# Altium PCB STM32H743I-EVAL2PCBDESIGN.PcbDoc (part 13 of 23)
Units mil, origin at the board's own origin, x right, y up, seen from the top; angles counter-clockwise.
Board outline 6558 x 5417 mil, 8 copper layers (L1_TOP, L2_GND, L3_HS1, L4_POWER, L5_SIG, L6_HS2, L7_GND, L8_BOTTOM), stack 61.368 mil thick; 620 components, 588 nets, 2945 pads, 1724 vias.
Unrouted connection lines stored in the file: 1.
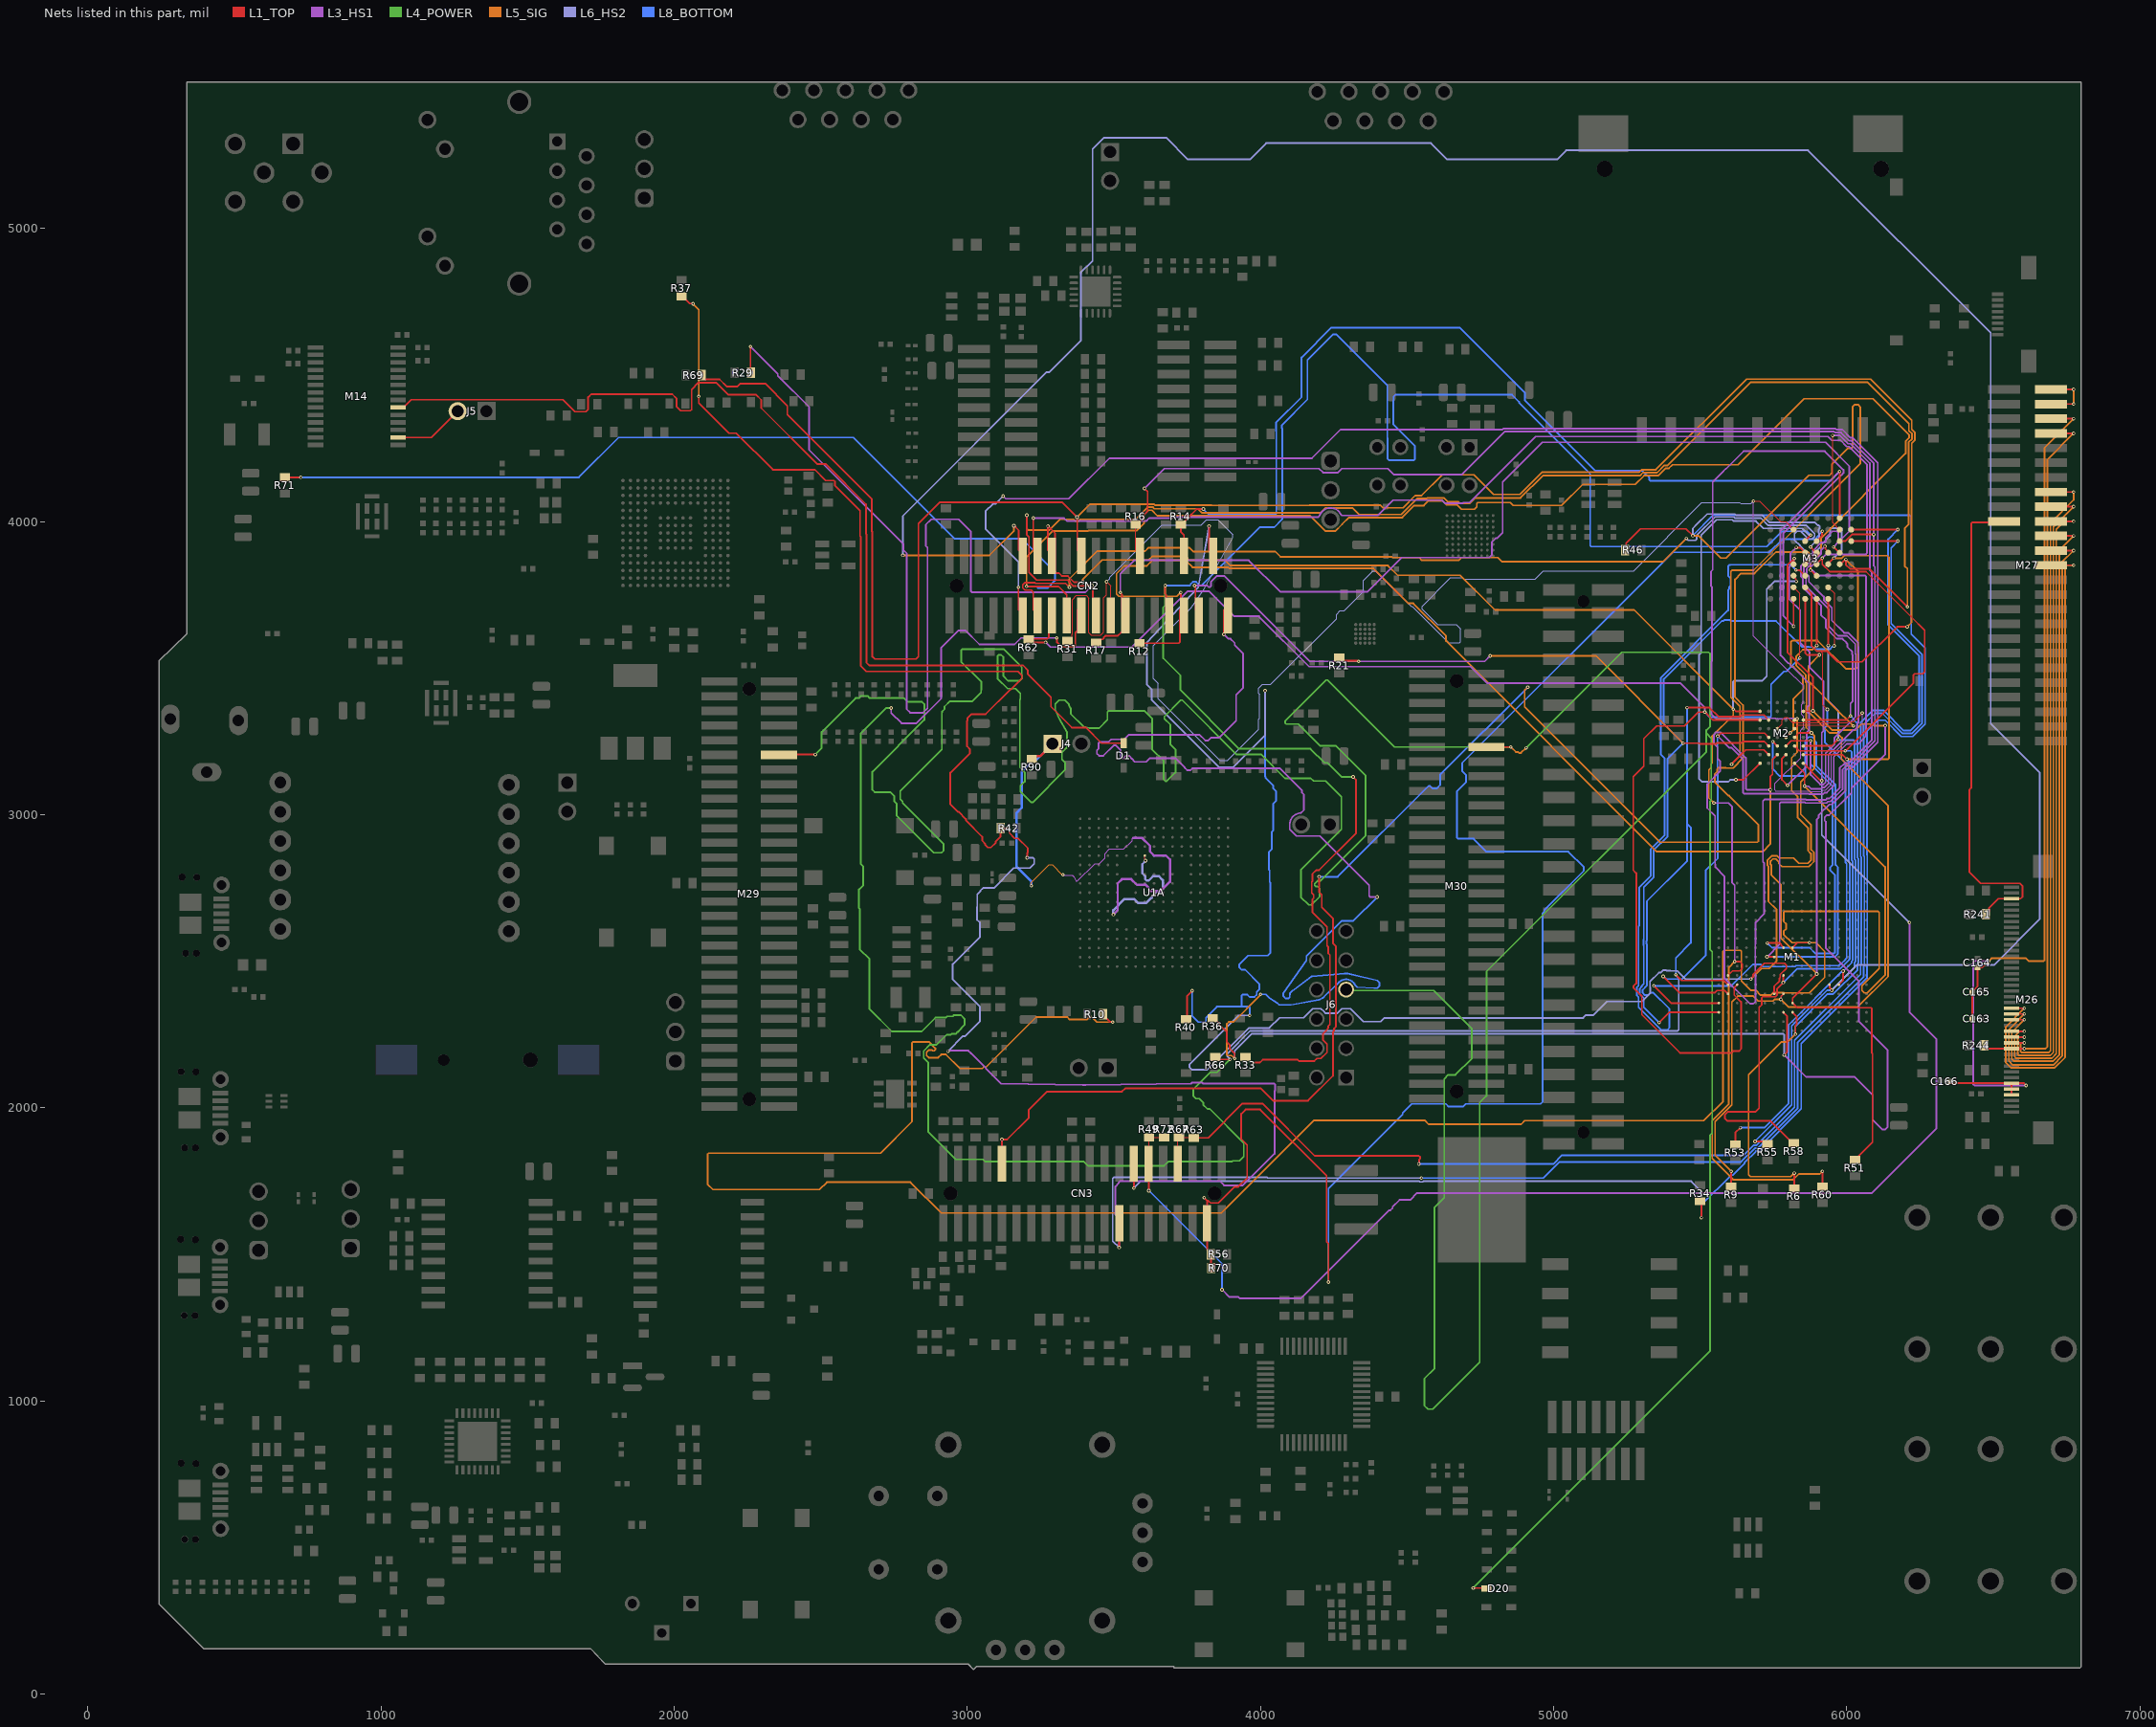
[diagram p10: the nets of this part, all layers, seen from the top]

## Via types
v1: diameter 12, hole 6, L1_TOP to L8_BOTTOM, tented both sides, 1724 vias

## Nets (pads, with @x,y where several pads share a name; then routed paths per layer and width w, separated by ;. In a path a pad name is that pad's centre, name@x,y a point inside that pad or via, vN(x,y) a via of type N, cw(c..) or ccw(c..) an arc to the next point about the centre after c; other vN are vias at no path point) (continued)
A11: M1.H9 M2.H5 M3.D6 R10.1 | length 9820.5
  L1_TOP w6: R10.1@3463.56,2319 3463.56,2315.06 3485.47,2293.15 3494.85,2293.15 v1(3496,2292) ; M1.H9@5815.49,2546.02 5815.49,2546.49 5832,2563 v1(5873,2563) ; M2.H5@5822.83,3175.06 5856,3141.89 v1(5856,3098) ; v1(5926,3916) 5927.15,3914.85 5927.15,3907.27 5935.37,3899.05 M3.D6@5935.37,3893.89
  L3_HS1 w6: v1(5856,3098) 5857.15,3096.85 5869.76,3096.85 5878.62,3088 5911.83,3088 5916.83,3093 5924.53,3093 5938,3106.47 5938,3204.84 6022.67,3289.51 6027.89,3289.51 6035.51,3297.12 6035.51,3309.03 6040,3313.53 6040,3515.86 6040.74,3516.6 6040.74,3552.22 6040,3552.96 6040,3571.53 6039,3572.53 6039,3586.68 6005.27,3620.41 5991.12,3620.41 5949,3662.53 5949,3705.14 5922,3732.14 5922,3743.86 5871,3794.86 5871,3813.81 5863.63,3821.18 5863.63,3839.9 5872.73,3849 5881.53,3849 5895,3862.47 5895,3869.86 5901.07,3875.93 5901.07,3877.98 5913,3889.9 5913,3903 v1(5926,3916)
  L5_SIG w6: v1(3496,2292) 3441.9,2292 3421.9,2312 3419.41,2312 3408.3,2300.89 3349.48,2300.89 3341.48,2308.89 3233.89,2308.89 3064,2139 3055.95,2139 3050.95,2134 2974.62,2134 2927,2181.62 2911,2181.62 2900.38,2171 2868.62,2171 2861,2178.62 2861,2189.38 2868.62,2197 2879.38,2197 2882.01,2194.37 2886.99,2194.37 2890.63,2198.01 2890.63,2202.99 2868.62,2225 2814.51,2225 2811,2221.49 2811,1952.47 2703.53,1845 2117.31,1845 2113.8,1841.49 2113.8,1739.2 2132,1721 2495.57,1721 2520.57,1746 2806,1746 2910.99,1641.01 3866.87,1641.01 4182.86,1957 4560.53,1957 4573.95,1943.57 4888.95,1943.57 4901.38,1956 5512.38,1956 5578,2021.62 5578,2533.49 5581.51,2537 5637.49,2537 5641,2533.49 5641,2432 5672,2401 5689.67,2401 5706.67,2384 5740.38,2384 5749.38,2393 5784.53,2393 5785.53,2392 5872.14,2392 5925,2444.86 5925,2533 5895,2563 v1(5873,2563) 5813.62,2563 5785,2591.62 5785,2602.38 5793.47,2610.86 5793.47,2627.43 5785,2635.9 5785,2666.49 5788.51,2670 6107.49,2670 6111,2666.49 6111,2474.94 6052,2415.94 6052,2399.62 6059.62,2392 6070.38,2392 6131,2452.62 6131,2821.47 5861,3091.47 ; v1(5856,3098) 5856,3096.49 5861,3091.49
A12: CN2.33 M2.G3 M3.B7 R12.1 | length 7634.6
  L1_TOP w4: v1(5952,4294) 5953.11,4292.89 5953.11,3995.63 M3.B7@5976.11,3972.63
  L1_TOP w6: R12.1@3587,3584.56 3587.44,3585 3721.49,3585 3725,3588.51 3725,3698.5 ; v1(3728,3758) 3728,3743 3728,3691 CN2.33@3739,3680.01 ; v1(5739,3085) 5739,3129.86 5747,3137.86 5747,3188.53 M2.G3@5763.42,3204.94
  L3_HS1 w6: v1(5739,3085) 5659.51,3085 5656,3088.51 5656,3193.86 5568.86,3281 5554.62,3281 5547,3273.38 5547,3242.43 5559,3230.43 5559,3192.03 5567.76,3183.27 5567.76,3147.65 5524,3103.89 5524,3022.67 5551,2995.67 5551,2830.62 5552,2829.62 5552,2820.62 5582.5,2790.12 5582.5,2443.12 5670.62,2355 5681.38,2355 5689,2362.62 5689,2452.29 5688,2453.29 5688,2559.53 5689,2560.53 5689,2632.38 5718,2661.38 5718,2835.38 5714,2839.38 5714,3047 5719,3052 5860.88,3052 5862.88,3050 5927.57,3050 5932.57,3055 5940.27,3055 5976,3090.73 5976,3145.62 5976,3158.43 5993.57,3176 6006.38,3176 6086,3255.62 6086,3826.63 6079,3833.63 6079,4199.53 6012.62,4265.91 6004.67,4265.91 5976.57,4294 v1(5952,4294)
  L5_SIG w6: v1(3728,3758) 3715,3745 3516.62,3745 3509,3752.62 3509,3822.53 3535.17,3848.69 3612.26,3848.69 3631.56,3868 3743.72,3868 3767.79,3843.93 3889.86,3843.93 3893.79,3840 4385.72,3840 4504.72,3721 4521.53,3721 4633,3609.53 4633,3592.72 5351.72,2874 5713.77,2874 5739,2899.23 v1(5739,3085)
A13: CN2.34 M2.G4 M3.A7 R14.1 | length 4675.4
  L1_TOP w6: CN2.34@3739,3883 3739,3954.27 3728,3965.27 R14.1@3728,3990.44 3731.94,3990.44 3751,4009.5 3751,4011.53 3782.47,4043 v1(3805,4043) ; M2.G4@5792.94,3204.94 5779,3191 5779,3119 v1(5798,3100) ; M3.A7@5975.98,4012.13 v1@5975.98,4170.87
  L3_HS1 w6: v1(5798,3100) 5798.14,3100 5864,3165.86 5864,3281.38 5872,3289.38 5872,3343.98 5866,3349.98 5866,3368.38 5871,3373.38 5871,3448.84 5803.11,3516.73 5801.14,3516.73 5774,3543.87 5774,3969.15 v1(5975.85,4171)
  L8_BOTTOM w6: v1(3805,4043) 3825,4023 4049.06,4023 4054,4027.94 4054,4309.33 4053,4310.33 4053,4337.67 4140.31,4424.98 4140.31,4559.98 4242.33,4662 4680,4662 4902,4440 4902,4414 5142.81,4173.19 5303.19,4173.19 5327,4149.38 5327,4142.51 5330.51,4139 5943.85,4139 v1(5975.85,4171)
A14: CN2.28 M1.J7 M2.F3 M3.C7 R16.1 | length 6377.8
  L1_TOP w4: R16.1@3574,3990.44 3574,3902.5 3575,3901.5
  L1_TOP w6: R16.1@3574,3990.44 3577.94,3990.44 3601.86,4014.36 3601.86,4022.24 3615,4035.38 3615,4102 v1(3604,4113) ; v1(5728.26,2514.77) M1.J7@5752.24,2514.77 ; v1(5748,3249) 5762.53,3234.47 M2.F3@5763.42,3234.47 ; M3.C7@5976.11,3934.63 5977.48,3933.26 5995.68,3933.26 6018.42,3956 v1(6092,3956)
  L3_HS1 w6: v1(3604,4113) 3672,4181 4199.92,4181 4213.42,4167.5 4264.58,4167.5 4278.08,4181 4434.44,4181 4454.44,4161 4686.95,4161 4832.95,4307 5957.38,4307 5960.38,4304 5980.72,4304 6008.81,4275.91 6016.76,4275.91 6092,4200.67 v1(6092,3956) 6092,3849.43 6096,3845.43 6096,3251.47 6010.53,3166 5997.72,3166 5986,3154.28 5986,3141.47 5986,3086.59 5944.41,3045 5936.72,3045 5931.72,3040 5858.73,3040 5856.73,3042 5774.99,3042 5771.47,3038.49 5771.47,2557.98 v1(5728.26,2514.77)
  L8_BOTTOM w6: v1(5728.26,2514.77) 5959.4,2514.77 5970,2525.37 5970,2820.38 5961.62,2828.77 5961.62,3101.91 5896,3167.53 5896,3247.33 5890,3253.33 5890,3257.38 5882.38,3265 5871.62,3265 5859.13,3252.51 5859.13,3135.14 5855.62,3131.63 5771.51,3131.63 5748,3155.14 v1(5748,3249)
A15: CN2.25 M1.H8 M2.F4 M3.D7 R17.1 | length 6028.4
  L1_TOP w6: R17.1@3440,3587.56 3450.46,3598.01 3461.77,3598.01 3465.28,3601.53 3465.28,3604.24 3470.96,3609.92 3512.8,3609.92 3524.38,3621.49 3528,3621.49 3541,3634.49 CN2.25@3541,3694.97 ; v1(3522,3758) 3522,3756.38 3528,3750.37 3528,3691 CN2.25@3539,3680.01 ; v1(5729,2562) 5771.72,2562 5775.97,2557.76 5775.97,2554.82 5783.99,2546.79 M1.H8@5783.99,2546.02 ; M2.F4@5792.94,3234.47 5810.47,3252 v1(5877,3252) ; v1(5955.37,3913.26) M3.D7@5974.74,3893.89
  L3_HS1 w6: v1(3522,3758) 3522,3821.38 3568.62,3868 3960.09,3868 4068.09,3760 4364.76,3760 4481.76,3877 4780.63,3877 4790,3886.37 4790,3909.47 4789,3910.47 4789,3929.53 4802.47,3943 4806.76,3943 4826,3962.24 4826,4135 4961.5,4270.5 5927.5,4270.5 6008.85,4189.15 6008.85,3966.74 5971,3928.89 ; v1(5877,3252) 5877,3135.62 5909.62,3103 5920.38,3103 5928,3110.62 5928,3208.98 5958,3238.98 5958,3262.38 6030,3334.38 6030,3520 6030.74,3520.74 6030.74,3548.08 6029,3549.82 6029,3582.53 6001.12,3610.41 5970.59,3610.41 5939,3642 5939,3701 5861,3779 5861,3809.67 5853.63,3817.04 5853.63,3844.05 5868.58,3859 5877.38,3859 5885,3866.62 5885,3900.64 5913.36,3929 5925.49,3929 5929,3932.51 5929,3945.27 5950.73,3967 5966.49,3967 5971,3962.49 5971,3928.89 ; v1(5955.37,3913.26) 5971,3928.89
  L8_BOTTOM w6: v1(5729,2562) 5745,2546 5873.38,2546 5893.38,2526 5956.49,2526 5960,2529.51 5960,2793.62 5944,2809.62 5944,2820.38 5951.62,2828 5951.62,3097.77 5877,3172.38 v1(5877,3252)
A16: CN2.21 M2.E4 M3.E7 R29.2 | length 8970.4
  L1_TOP w2: M2.E4@5792.94,3264 5792.94,3264.47 5807,3278.53 v1(5807,3279)
  L1_TOP w6: v1(2260,4597) 2260,4509.56 R29.2@2261.56,4508 ; v1(3203,4021.47) 3203,3954.41 3210,3947.42 3210,3826.59 3236.3,3800.29 3342.09,3800.29 3362.38,3780 3405.24,3780 3406.75,3781.5 v1(3425,3781.5) 3425,3779.88 3428,3776.88 3428,3691 CN2.21@3439,3680.01 ; M3.E7@5976.11,3855.89 5980.27,3855.89 5995.38,3871 v1(5997,3871) 5997,3853.2 6011.05,3839.15 6076.85,3839.15 v1(6207,3709)
  L3_HS1 w6: v1(2260,4597) 2353,4504 2353,4497.86 2460,4390.86 2460,4244.57 2782,3922.57 2782,3902.38 2793,3891.38 2793,3359.72 2804.72,3348 2848.53,3348 2864,3363.47 2864,3911.28 2858,3917.28 2858,3989.02 2876.98,4008 2969.88,4008 3012,3965.88 3012,3762.51 3015.51,3759 3402.5,3759 v1(3425,3781.5)
  L5_SIG w6: v1(3203,4021.47) 3203,3975.01 3206.51,3971.5 3280.38,3971.5 3316.89,4008 3362.62,4008 3368.62,4002 3379.38,4002 3385.38,4008 3573.47,4008 3614.47,4049 3633.53,4049 3638.53,4044 3785.62,4044 3799.62,4030 4206.14,4030 4222.64,4046.5 4314.12,4046.5 4336.62,4024 4479.86,4024 4534.45,4078.59 4567.18,4078.59 4569.6,4081 4625.53,4081 4639.53,4067 4675.62,4067 4679.62,4063 4714.62,4063 4732.62,4081 4887.14,4081 4963.14,4157 5294.47,4157 5304.47,4167 5353.14,4167 5378.14,4192 5389.21,4192 5673.21,4476 6070.17,4476 6212,4334.17 6212,4310.53 6223,4299.53 6223,4282.47 6211,4270.47 6211,3990 6198,3977 6198,3848.31 6207,3839.31 v1(6207,3709) ; v1(5807,3279) 5818,3290 5818,3395.62 5853,3430.62 5853,3441.38 5850,3444.38 5850,3473 5819,3504 5813.51,3504 5810,3507.51 5810,3590.49 5813.51,3594 5901,3594 5997.51,3497.49 6030.49,3497.49 6038.74,3505.74 6038.74,3829.26 v1(5997,3871)
A17: CN2.23 M2.D3 M3.B3 R31.2 | length 7119.6
  L1_TOP w4: R31.2@3342,3593.56 3345.94,3593.56 3357.72,3605.34 3357.72,3614.73 3359,3616.01 3359,3734 3372.52,3747.52 3405.48,3747.52 3414,3739 3414,3621.01 3422.52,3612.49 3455.48,3612.49 3465.24,3622.25 3465.24,3740.11 3475,3749.87 v1(3475,3795) 3489,3781 CN2.23@3489,3680.01 ; v1(5682,4070) 5702.88,4070 5773.88,3999 5792.26,3999 M3.B3@5818.63,3972.63 ; M2.D3@5763.42,3293.53 5779,3309.11 5779,3321.84 5789.22,3332.06 5796.67,3332.06 5814.67,3314.06 6002.78,3314.06 6006.73,3318 6024,3318 v1(6053,3347)
  L3_HS1 w4: v1(5682,4070) 5682,3609 5822,3469 5823.97,3469 5852,3440.97 5852,3381.25 5847,3376.25 5847,3342.11 5853,3336.11 5853,3297.25 5843,3287.25 5843,3194 5755,3106 5755,3083.34 5757.34,3081 5872.89,3081 5874.89,3079 5915.56,3079 5920.56,3084 5928.25,3084 5947,3102.75 5947,3201.11 5999.89,3254 6033,3254 6053,3274 v1(6053,3347)
  L6_HS2 w4: v1(3475,3795) 3486,3806 3486,3811.11 3663.89,3989 3798.39,3989 3815.89,4006.5 3855.23,4006.5 3905.43,3956.3 3905.43,3943.88 3807,3769.26 3764.17,3706.17 3761.83,3703.83 3634.93,3576.93 3634.93,3465.07 3651.51,3448.49 3651.51,3395.51 3862.03,3185 3887,3185 3994,3292 3994,3325.1 3997,3328.1 3997,3410.89 3994,3413.89 3994,3432.11 4006.89,3445 4035.03,3445 4259,3668.97 4259,3683.11 4271.89,3696 4285.89,3696 4351,3761.11 4351,3799 4384,3832 4392.1,3832 4514.1,3710 4516.97,3710 4640.92,3586.05 4678.85,3586.05 4682.95,3590.15 4682.95,3634.05 4668.51,3648.49 4604.54,3648.49 4552,3701.03 4552,3710.97 4649.03,3808 4688.97,3808 4693.97,3803 4752.97,3803 4753.97,3804 4937.73,3804 4965.73,3832 5272.99,3832 5505.99,4065 5634.82,4065 5638.48,4061.35 5673.35,4061.35 v1(5682,4070)
A18: CN2.31 M2.H1 M3.C4 R33.2 | length 7929.3
  L1_TOP w6: v1(3675,3781.5) 3675,3753.52 3678,3750.52 CN2.31@3678,3698.5 ; R33.2@3949,2173.56 3952.94,2173.56 3972.5,2154 3997.53,2154 4007.53,2164 4126.18,2164 4130.95,2159.24 4183.59,2159.24 4192.36,2168 4206.5,2168 4227,2188.5 4227,2217.5 4213,2231.5 4213,2252 4227,2266 4227,2266.86 4231,2270.86 4231,2278.36 4237,2284.36 4237,2521.64 4231,2527.64 4231,2549.14 4227,2553.14 4227,2617.5 4177,2667.5 4177,2710.91 4181.35,2715.26 4181.35,2726.03 4175,2732.38 4175,2771.12 4177,2773.12 4177,2797.53 4190.47,2811 4200.14,2811 4326,2936.86 4326,3117.79 4316,3127.79 v1(4316,3129) ; v1(5622,3119) 5647.94,3119 M2.H1@5704,3175.06 ; M3.C4@5858,3934.63 v1(5877.37,3954)
  L4_POWER w6: v1(3675,3781.5) 3675,3714.03 3668,3707.03 3668,3533.86 3727,3474.86 3727,3425.33 3927.33,3225 4170.57,3225 4218.57,3177 4228.71,3177 4276.71,3129 v1(4316,3129)
  L6_HS2 w6: v1(5622,3119) 5602.5,3119 5595.5,3112 5507.03,3112 5496,3123.03 5496,3544.53 5503.51,3552.04 5503.51,3953.51 5556,4006 5610.38,4006 5614.38,4002 5690.24,4002 5715.24,3977 5847.53,3977 5870.53,3954 v1(5877.37,3954)
  L8_BOTTOM w6: v1(3675,3781.5) 3758.49,3781.5 3762,3785.02 3762,3786.89 3769.62,3794.5 3780.38,3794.5 3788,3786.89 3788,3785.02 3791.51,3781.5 3797.5,3781.5 3996.72,3980.72 4046.72,3980.72 4074,4008 4074,4317.62 4073,4318.62 4073,4329.38 4160.31,4416.69 4160.31,4551.69 4247.62,4639 4258.38,4639 4433,4464.38 4433,4284.08 4434.08,4283 4434.08,4213.51 4437.59,4210 4523.49,4210 4527,4213.51 4527,4258 4453,4332 4453,4410.38 4454,4411.38 4454,4426.49 4460.51,4433 4857.67,4433 4882,4408.67 4882,4405.72 5125,4162.72 5125,3918.51 5128.51,3915 5727.57,3915 5779.57,3967 5864.37,3967 v1(5877.37,3954)
A19: CN3.13 M2.G2 M3.D5 R34.1 R46.2 | length 9288.1
  L1_TOP w6: v1(3568,1725.99) CN3.13@3568,1808.99 ; R46.2@5244.44,3903 5247.2,3905.76 5247.2,3926.2 5296,3975 5452,3975 v1(5475,3952) ; R34.1@5500,1680.88 5504,1676.88 v1(5504,1625) ; v1(5607,3172) 5656,3221 5717.83,3221 M2.G2@5733.89,3204.94 ; v1(5876.63,3913.26) M3.D5@5896,3893.89
  L5_SIG w6: v1(5475,3952) 5494.47,3952 5570.99,3875.49 5587.96,3875.49 5870.47,4158 5941.87,4158 5949.48,4165.62 5949.48,4195.87 6003.62,4250 6016.49,4250 6020,4253.51 6020,4391.38 6027.62,4399 6038.38,4399 6046,4391.38 6046,4197.72 5682.28,3834 5608.51,3834 5605,3830.49 5605,3400.53 5636,3369.53 5636,3201 v1(5607,3172)
  L6_HS2 w6: v1(3568,1725.99) 3591.01,1749 4541.62,1749 4543.62,1747 4554.38,1747 4556.38,1749 5470,1749 5504,1715 v1(5504,1625) ; v1(5475,3952) 5475,3977 5488,3990 5524,4026 5618.67,4026 5622.67,4022 5711.14,4022 5717.14,4016 5717.73,4016 5736.73,3997 5892.14,3997 5902.14,3987 5904.49,3987 5908,3983.49 5908,3976.38 5904,3972.38 5904,3961.62 5906,3959.62 5906,3944.25 5876.63,3914.88 v1(5876.63,3913.26)
  L8_BOTTOM w6: v1(5475,3952) 5545,4022 6213.97,4022 6220,4015.97 6220,3616.63 6267.42,3569.21 6267.42,3308.57 6225.71,3266.86 6186.53,3266.86 6131.19,3322.2 6106.62,3322.2 6069,3284.58 6069,2862.81 6070,2861.81 6070,2481.86 6069,2480.86 6069,2442.14 5845,2218.14 5845,1996.33 5700.67,1852 5690.85,1852 5651.12,1812.27 5651.12,1809.62 5611.38,1769.88 5605.88,1769.88 5504,1668 v1(5504,1625)
A20: CN3.11 M2.H6 M3.D4 R49.2 R72.1 | length 5701.6
  L1_TOP w4: CN3.11@3618,1808.99 3620,1810.99 R49.2@3620,1899 3620.56,1898.44 R72.1@3671,1898.44
  L1_TOP w6: CN3.11@3618,1808.99 3619,1807.99 v1(3619,1717) ; v1(5828,3912) 5829.15,3910.85 5841.04,3910.85 5856.63,3895.26 M3.D4@5856.63,3893.89 ; M2.H6@5852.36,3175.06 5910.27,3117.15 5913.85,3117.15 v1(5915,3116)
  L3_HS1 w6: v1(3869,1379) 3894,1354 3924.62,1354 3928.62,1350 4138.86,1350 4438.86,1650 4443.38,1650 4451,1657.62 4451,1662.14 4474.43,1685.57 4510.57,1685.57 4534,1709 6086,1709 6306.17,1929.17 6306.17,2233.69 6214,2325.86 v1(6214,2632) ; v1(5828,3912) 5808,3892 5808,3863.4 5812.95,3858.45 5812.95,3853.48 5804,3844.53 5804,3734.46 5841,3697.46 5841,3587.38 5873,3555.38 5873,3502.81 5921,3454.81 5921,3286.22 5915,3280.22 v1(5915,3116)
  L6_HS2 w6: v1(5915,3116) 5915,2931 v1(6214,2632)
  L8_BOTTOM w6: v1(3619,1717) 3869,1467 v1(3869,1379)
A21: CN3.04 M3.C5 R56.2 R70.1 | length 5796.6
  L1_TOP w6: v1(3808,1693) 3818.61,1682.39 ; R70.1@3831.44,1453 3831.44,1499 R56.2@3830.44,1500 3830.44,1503.94 3818,1516.38 CN3.04@3818,1606 3818,1681.79 3818.61,1682.39 ; v1(4232,1405) 4232,1536.31 4225.43,1542.89 4225.43,1767.57 3999,1994 3949,1994 3934.38,1979.38 3934.38,1893.19 3954.38,1873.19 3954.38,1760.71 3923.9,1730.23 3911.59,1730.23 3856.43,1675.07 3829.57,1675.07 3822.25,1682.39 3818.61,1682.39 ; M3.C5@5897.37,3934.63 5898.74,3934.63 5916.11,3952 5916.11,3966.11 v1(5917,3967)
  L8_BOTTOM w6: v1(4232,1405) 4232,1723.86 4485,1976.86 4485,1982.49 4515.51,2013 4632.72,2013 4642.14,2003.57 4691.21,2003.57 4700.64,2013 4955.1,2013 4962.62,2020.52 4962.62,2663.76 4968,2669.14 4968,2673.82 5103,2808.82 5103,2821.41 5050.41,2874 4771.28,2874 4727.28,2918 4673.51,2918 4670,2921.51 4670,3079 4701.13,3110.13 4701.13,3136.38 4688,3149.52 4688,3176.14 5406.86,3895 5735.86,3895 5780.86,3940 5892,3940 5905.27,3953.27 5905.27,3955.27 v1(5917,3967)
A22: CN3.07 M3.B8 R63.2 R67.1 | length 4965
  L1_TOP w4: CN3.07@3718,1808.99 3718,1894.44 R67.1@3722,1898.44 3771,1898.44 R63.2@3772,1897.44
  L1_TOP w6: R63.2@3772,1897.44 3822.3,1897.44 3938.86,2014 4007.28,2014 4185.28,1836 4540.76,1836 4544.27,1832.49 4544.27,1825.9 4541.15,1822.77 4541.15,1809.15 v1(4540,1808) ; M3.B8@6015.61,3972.76 v1@6174.35,3972.76
  L8_BOTTOM w6: v1(4540,1808) 4999.25,1808 5029.25,1838 5648.57,1838 5682.57,1872 5692.38,1872 5822,2001.62 5822,2229.62 6047,2454.62 6047,2487.15 6050,2490.15 6050,2853.52 6047,2856.52 6047,3314 6089,3356 6125.67,3356 6194.81,3286.86 6217.43,3286.86 6247.42,3316.85 6247.42,3541.27 6141.48,3647.21 6141.48,3939.89 v1(6174.48,3972.89)
A23: CN3.16 M3.C8 R37.1 R42.2 | length 11658.6
  L1_TOP w6: R37.1@2025,4768.44 2028.94,4768.44 2053.23,4744.15 2062.85,4744.15 v1(2064,4743) ; v1(2084,4427) 2084,4404.05 2186.52,4301.52 2211.48,4301.52 2336.1,4176.9 2479.62,4176.9 2516.17,4140.34 2544.62,4140.34 2548.72,4136.24 2548.72,4122.1 2634,4036.81 2634,3950.14 2636,3948.14 2636,3508.14 2655.14,3489 3171.92,3489 3185.54,3475.38 3185.54,3464.62 3147.92,3427 3146.45,3427 3062.45,3343 3014.35,3343 3000,3328.65 3000,3320.86 2999,3319.86 2999,3233.35 3009,3223.35 3009,3210.2 2942,3143.2 2942,3035.62 2967.45,3010.16 2969.8,3010.16 2995.25,2984.71 2995.25,2980.38 3051,2924.64 3051,2910.65 3060.31,2901.34 3060.31,2897.31 3069.62,2888 3080.38,2888 3096.91,2904.53 3096.91,2909.16 3113.44,2925.69 R42.2@3113.44,2954 3136,2954 3143.94,2946.06 3143.94,2937.22 3161.86,2919.3 3172.7,2919.3 3206,2886 3206,2871.31 3204,2869.31 v1(3204,2853) ; v1(3518,1523) CN3.16@3518,1606 ; M3.C8@6015.61,3933.39 v1@6174.35,3933.39
  L3_HS1 w6: v1(2934,2193) 2935.15,2194.15 2939.39,2194.15 2940.24,2195 3003.14,2195 3012.14,2186 3012.14,2185.47 3112.86,2084.76 3114.62,2083 3393.62,2078 3404.38,2078 3764.02,2083 3765.77,2084.76 3767.02,2086 3800.98,2086 3803.98,2083 4046.49,2083 4048.24,2081.24 4050,2079.49 4050,2058.47 4048,2056.47 4048,1843.02 3939.98,1735 3875.49,1735 3860.57,1749.92 3522.44,1749.92 3516,1743.49 3516,1742.38 3505,1731.38 3505,1634.5 3518,1621.5 v1(3518,1523)
  L5_SIG w6: v1(2064,4743) 2084,4723 v1(2084,4427)
  L6_HS2 w6: v1(2934,2193) 2985.57,2244.57 2992.57,2244.57 3043,2295 3043,2344.9 2950,2437.9 2950,2490.1 3043,2583.1 3043,2631.05 3033,2641.05 3033,2684.95 3034,2685.95 3034,2728.38 3044,2738.38 3044,2740.38 3053.62,2750 3090.5,2750 3158.5,2818 3213.38,2818 3228,2832.62 3228,2849.38 3224.38,2853 v1(3204,2853) ; v1(3518,1523) 3496,1545 3496,1758.49 3499.51,1762 4022.45,1762 4024.45,1760 v1(4549,1760)
  L8_BOTTOM w6: v1(4549,1760) 4965.39,1760 5020.39,1815 5639.71,1815 5686.71,1862 5696.53,1862 5833,1998.47 5833,2223 6058,2448 6058,2484.01 6060,2486.01 6060,2857.66 6058,2859.66 6058,3307 6097,3346 6121.53,3346 6190.67,3276.86 6221.57,3276.86 6257.42,3312.71 6257.42,3545.41 6151.48,3651.35 6151.48,3910.52 v1(6174.48,3933.52)
B2: M26.19 M27.25 | length 2262.8
  L1_TOP w6: M26.19@6562.16,2339.52 v1(6606,2339.52) ; M27.25@6697,3851 v1(6774,3851)
  L5_SIG w6: v1(6606,2339.52) 6543,2276.52 6543,2154 6561,2136 6709,2136 6745,2172 6745,3847.49 6748.51,3851 v1(6774,3851)
B3: M26.18 M27.27 | length 2244.3
  L1_TOP w6: M26.18@6562.16,2319.83 v1(6606,2319.83) ; M27.27@6697,3901 v1(6774,3901)
  L5_SIG w6: v1(6606,2319.83) 6553,2266.83 6553,2159.44 6566.44,2146 6704.86,2146 6735,2176.14 6735,3862 v1(6774,3901)
B4: M26.17 M27.29 | length 2237.2
  L1_TOP w6: M26.17@6562.16,2300.15 v1(6606,2300.15) ; M27.29@6697,3951 v1(6774,3951)
  L5_SIG w6: v1(6606,2300.15) 6563,2257.15 6563,2166.98 6571.26,2158.72 6692.05,2158.72 6703.44,2158.72 6725,2180.28 6725,3902 v1(6774,3951)
B5: M26.15 M27.31 | length 2240.7
  L1_TOP w6: M26.15@6562.16,2260.78 v1(6606,2260.78) ; M27.31@6697,4001 v1(6774,4001)
  L5_SIG w6: v1(6606,2260.78) 6590.68,2260.78 6573,2243.1 6573,2174 6578.28,2168.72 6699.3,2168.72 6715,2184.43 6715,3974 6742,4001 v1(6774,4001)
B6: M26.14 M27.33 | length 2218.3
  L1_TOP w6: M26.14@6562.16,2241.09 v1(6606,2241.09) ; M27.33@6697,4051 v1(6774,4051)
  L5_SIG w6: v1(6606,2241.09) 6588.09,2241.09 6583,2236 6583,2182.24 6586.51,2178.72 6695.16,2178.72 6705,2188.57 6705,3982 v1(6774,4051)
B7: M26.13 M27.35 | length 2206.2
  L1_TOP w6: M26.13@6562.16,2221.41 v1(6606,2221.41) ; M27.35@6697,4101 v1(6774,4101)
  L5_SIG w6: v1(6606,2221.41) 6596.51,2221.41 6593,2217.89 6593,2192.24 6596.51,2188.72 6689.49,2188.72 6695,2194.24 6695,3995 6774,4074 v1(6774,4101)
BL_CTRL: M26.12 M27.43 R244.1 | length 2428.7
  L1_TOP w6: R244.1@6470.56,2213 6470.56,2212.5 6481.34,2201.72 v1(6606,2201.72) ; M27.43@6697,4301 v1(6774,4301)
  L5_SIG w6: v1(6606,2201.72) 6678.49,2201.72 6685,2208.24 6685,4212 v1(6774,4301)
BLGND: M27.47 M27.49 | length 204
  L1_TOP w6: M27.47@6697,4401 v1(6774,4401) ; M27.49@6697,4451 v1(6774,4451)
  L5_SIG w6: v1(6774,4401) v1(6774,4451)
BLVDD: C163.1 C164.1 C165.1 C166.1 M26.4 M26.5 M26.6 M27.45 | length 3333.7
  L1_TOP w6: C166.1@6350.67,2090 6350.67,2089.92 6356.88,2083.7 6360.31,2083.7 6360.4,2083.61 M26.6@6542.38,2083.61 ; C163.1@6428.17,2304 6428.17,2394.83 C165.1@6428,2395 6428,2395.08 6446,2413.08 C164.1@6446,2478.17 6462.17,2478.17 v1(6484,2500) ; M26.4@6562.11,2044.2 M26.5@6562.11,2063.88 M26.6@6562.11,2083.57 6604.43,2083.57 v1(6612,2076) ; M27.45@6697,4351 v1(6774,4351)
  L3_HS1 w6: v1(6484,2500) 6435.51,2500 6432,2496.49 6432,2079.51 6435.51,2076 v1(6612,2076)
  L5_SIG w6: v1(6484,2500) 6494,2510 6611.38,2510 6621.38,2500 6671.49,2500 6675,2503.51 6675,4252 v1(6774,4351)
BOOT0: J4.1 R90.2 U1A.E8 | length 2134.3
  L1_TOP w4: U1A.E8@3605.52,2859.99 3605.52,2847.65 3608,2845.16 v1(3608,2843)
  L1_TOP w8: R90.2@3220,3189.56 3229.78,3199.34 3247.91,3199.34 J4.1@3290.57,3242
  L3_HS1 w2: v1(3326,2795) 3327,2794 3357.16,2794 3358.84,2792.32 cw(c3353,2783) 3362.9,2787.79 3369.5,2774.17 3370.67,2773 3375,2773 3435,2833 3449.7,2833 3469,2852.3 3469,2866.87 3485.13,2883 3533.8,2883 3562,2911.2 3562,2918.26 3564.83,2921.09 3565.46,2920.46
  L3_HS1 w8: v1(3498,2659) 3513.02,2674.02 3513.02,2765.77 3527.28,2780.03 3558.83,2780.03 3578.86,2760 3609.3,2760 3618.99,2750.31 3618.99,2743.69 3623.68,2739 3658.8,2739 3691.04,2771.24 3691.04,2847.06 3677.1,2861 3636.2,2861 3623,2874.2 3623,2893.81 3596.35,2920.46 3565.46,2920.46
  L5_SIG w2: v1(3218,2757.21) 3218,2768.56 3278.44,2829 3289.44,2829 3323.44,2795 v1(3326,2795)
  L6_HS2 w8: v1(3498,2659) 3498,2674 3536,2712 3568.5,2712 3581.49,2699.02 3610.79,2699.02 3629,2717.22 3629,2719.79 3647.2,2738 3657.8,2738 3667,2747.2 3667,2776.8 3653.8,2790 3633.5,2790 3618.23,2774.73 3611.6,2774.73 3606.92,2779.42 3606.92,2789.8 3597,2799.72 3597,2830.92 3608,2841.92 v1(3608,2843)
  L8_BOTTOM w8: v1(3218,2757.21) 3218,2772.56 3167,2823.56 3167,3005.37 3185.84,3024.21 3185.84,3147.04 3219.82,3181.02 3229.59,3181.02 J4.1@3290.57,3242
Bootloader_BOOT0: D1.2 M14.20 | length 3539.7
  L1_TOP w6: M14.20@1058,4389.61 1077,4389.61 1103.39,4416 1619.95,4416 1660.67,4375.28 1698.68,4375.28 1706.34,4382.94 1706.34,4424.76 1716.3,4434.72 1993.12,4434.72 2007.5,4420.34 2007.5,4392.66 2021.88,4378.28 2055.24,4378.28 2059.34,4382.38 2059.34,4450.49 2082.85,4474 2143,4474 2184.28,4432.72 2279.12,4432.72 2296.78,4415.06 2296.78,4387.38 2487.27,4196.9 2516.34,4196.9 2654,4059.24 2654,3958.43 2656,3956.43 2656,3518.8 2665.37,3509.43 3189.72,3509.43 3205.54,3493.6 3205.54,3480.04 3285,3400.57 3285,3368.72 3356.29,3297.42 3404.11,3297.42 3457.4,3244.13 D1.2@3534,3244.13
Bootloader_RESET: J5.2 M14.16 | length 229.4
  L1_TOP w6: M14.16@1069,4286.76 1170.76,4286.76 J5.2@1261,4377
CLK: M26.38 M27.32 R241.1 | length 1701
  L1_TOP w6: R241.1@6474.56,2660 6485.34,2670.78 6485.34,2681.34 6517.49,2713.49 M26.38@6562.11,2713.49 6562.2,2713.58 6593.19,2713.58 6600.01,2720.4 6600.01,2756.36 6590.6,2765.76 6456.24,2765.76 6419,2803 6419,3085.47 6425,3091.47 6425,3993.49 6428.51,3997 6533,3997 M27.32@6537,4001
D0: CN2.39 M1.R8 M2.B6 M3.E3 R36.2 | length 9275.7
  L1_TOP w6: R36.2@3837,2305.56 3840.94,2305.56 3860,2286.5 3860,2282.98 3885.28,2257.7 3885.28,2224.48 3895.28,2214.48 3895.28,2201.1 3912,2184.38 v1(3912,2168) ; v1(3875,3615.5) 3875,3698.5 ; M1.R8@5783.99,2325.54 5797.06,2312.48 5797.06,2191.15 5787,2181.1 v1(5787,2180) ; M3.E3@5818.63,3855.89 5819.85,3857.11 v1@5819.85,3872.85 ; v1(5821,3874) v1@5819.85,3872.85 ; M2.B6@5852.36,3352.94 5852.71,3353.29 5884.29,3353.29 v1(5885,3354) 5885,3467 5798,3554 5798,3851 v1@5819.85,3872.85
  L3_HS1 w6: v1(3875,3615.5) 3890.35,3600.15 3897.99,3600.15 3912.2,3585.95 3912.2,3578.31 3941,3549.5 3941,3432.62 3917,3408.62 3917,3320.62 3859.38,3263 3832.38,3263 3822.38,3253 3811.62,3253 3791.62,3273 3551.67,3273 3535.67,3257 3490.67,3257 3481.67,3248 3451.3,3248 3447.78,3244.49 3447.78,3225.42 3442,3219.64 3442,3208.62 3449.62,3201 3464.05,3201 3500.05,3237 3505.02,3237 3523,3219.02 3523,3196.51 3526.51,3193 3532.62,3193 3540.62,3201 3551.38,3201 3558,3194.38 3558,3193.47 3560.47,3191 3571.47,3180 3609.53,3180 3622.53,3193 3709.43,3193 3742,3160.43 3742,3159.62 3749.62,3152 3762.07,3152 3767.88,3157.81 4067.33,3157.81 4141,3084.14 4141,3075.62 4148,3068.62 4148,3015.86 4137.45,3005.31 ccw(c4138.79,2966.33) 4099.78,2966.33 4099.78,2950.17 4101.54,2948.42 4122.63,2927.33 4202.04,2927.33 4371,2758.37 4371,2722.51 4374.51,2719 v1(4398,2719) ; v1(5787,2180) 5861.88,2105.12 6027.27,2105.12 6088,2044.38 6088,1958.62 6120.62,1926 6131.38,1926 6139,1933.62 6139,2197.54 6042,2294.54 6042,2430.38 5929,2543.38 5929,2975.65 5924.52,2980.13 5924.52,2990.9 5932.13,2998.52 5940.35,2998.52 6016,3074.16 6016,3090 6131,3205 v1(6131,3304)
  L5_SIG w6: v1(3912,2168) 3911.38,2168 3901.38,2178 3888.51,2178 3885,2181.51 3885,2286 3892,2293 3908.53,2293 3997,2381.47 3997,2382.38 4000,2385.38 v1(4000,2387) ; v1(5885,3354) 5949.99,3289.01 6030.83,3289.01 6051.01,3309.2 6087.59,3309.2 6092.79,3304 v1(6131,3304)
  L6_HS2 w6: v1(3912,2168) 3911.85,2168.15 3911.85,2194.71 3969.14,2252 5783.49,2252 5787,2248.49 v1(5787,2180)
  L8_BOTTOM w6: v1(4000,2387) 4018.01,2387 4031.01,2374 4058.13,2356.64 4063.77,2351 4104.64,2351 4198.45,2368.6 ccw(c4192,2403) 4216.5,2378.01 4267.51,2428 cw(c4292,2403) 4323.79,2417.65 4330.28,2411.16 4387.62,2408.14 4398.38,2408.14 4406,2415.76 4406,2426.53 4398.38,2434.14 4304.77,2456.5 ccw(c4292,2403) 4287.17,2457.79 4175.49,2448.18 4173.36,2448 4108.62,2399 4101,2391.38 4099.84,2376.57 4096.33,2373.06 4093.89,2373.06 4085.56,2373.06 4077.94,2380.67 4077.94,2391.44 4157,2502.47 4157,2517.5 4277.5,2638 4317,2638 v1(4398,2719)
D1: CN2.38 M1.N7 M2.C5 M3.H3 R40.2 | length 9377.3
  L1_TOP w6: R40.2@3746,2301.56 3749.94,2305.5 3749.94,2381.94 v1(3767,2399) ; 3825,3901.5 v1(3825,3984.5) ; v1(5672.92,2438.92) 5672.92,2440.54 5681.07,2448.7 5681.07,2455.02 5719.08,2493.02 5788.13,2493.02 5793.99,2487.17 5793.99,2475.67 5772.91,2454.59 5772.91,2443.66 5770.74,2441.49 5770.74,2432.21 5752.5,2413.97 M1.N7@5752.5,2388.54 ; M3.H3@5818.76,3736.28 5818.81,3736.22 5818.81,3643.19 v1(5819,3643) ; M2.C5@5822.47,3323.06 5824.04,3323.06 5827.99,3327 v1(5831,3327)
  L3_HS1 w6: v1(5819,3643) 5784,3678 5784,3961 5981,4158 5981.24,4158 5988.85,4165.62 5988.85,4176.38 5925.24,4240 5648,4240 5588,4180 5587.47,4180 5574,4166.53 5574,4166 5543,4135 5543,3835.67 5537,3829.67 5537,3780.33 5540,3777.33 5540,3523.47 5539,3522.47 5539,3342 5554,3327 5736.47,3327 5738.47,3329 5757.53,3329 5759.53,3327 5792.47,3327 5794.47,3329 5813.53,3329 5815.53,3327 v1(5831,3327)
  L5_SIG w6: v1(5672.92,2438.92) 5709,2475 5735.16,2475 5761.26,2501.1 5761.26,2675.41 5732.98,2703.69 5732.98,2823.47 5729.98,2826.47 5729.98,2845.53 5743.45,2859 5762.5,2859 5769.5,2852 5818.35,2852 5836.35,2834 5868,2834 5878,2844 5878,2867.38 5868,2877.38 5868,2954.33 5833,2989.33 5833,3060.76 5812,3081.76 5812,3194.07 5831,3213.07 v1(5831,3327)
  L6_HS2 w6: v1(3825,3984.5) 3788,3776.12 3612,3587.14 3612,3444.14 3629,3427.14 3629,3391.16 3859.16,3161 3905,3161 4016,3272 v1(4016,3423) ; v1(3963,2315) 3924.62,2315 3758,2148.38 3758,2137.62 3765.62,2130 3818.86,2130 3960.86,2272 4030.19,2272 4065.19,2307 4146.5,2307 4177.5,2338 4206.5,2338 4208.03,2336.46 4215.43,2329.07 4222.5,2322 4261.5,2322 4277.5,2338 4306.5,2338 4350.5,2294 4409.75,2294 4422.3,2306.55 5100.97,2306.55 5110.43,2316 5136.14,2316 5182.66,2362.52 5300.9,2362.52 5330,2391.62 5330,2409.62 5329,2410.62 5329,2430.86 5359.14,2461 5365.28,2461 5373.28,2469 5383.96,2469 5384.96,2468 5398.38,2468 5399.38,2467 5422.38,2467 5450.47,2438.92 v1(5672.92,2438.92)
  L8_BOTTOM w6: v1(3767,2399) 3767,2313.62 3788.62,2292 3810.49,2292 3814,2295.51 3814,2307.62 3851.38,2345 3935.62,2345 ; v1(3963,2315) 3963,2341.49 3959.49,2345 3935.62,2345 ; v1(4016,3423) 4016,3130.28 4016.81,3129.47 4016.81,3125.72 4043,3099.53 4043,3090.28 4053,3080.28 4053,3046.38 4043,3036.38 4043,2945.19 4039,2941.19 4039,2883.4 4029,2873.4 4029,2812.67 4031.37,2810.3 4031.37,2770.61 4034,2767.99 4034,2528.51 4024.49,2519 3957.62,2519 3928,2489.38 3928,2478.62 3935.62,2471 3947.67,2471 3996,2422.67 3996,2403.61 3987,2394.62 3987,2385.62 3979.38,2378 3963.26,2378 3955.26,2386 3939.13,2386 3935.62,2382.49 3935.62,2345
D2: CN3.31 M1.R9 M2.C6 M3.E4 R6.2 | length 8362.7
  L1_TOP w6: CN3.31@3118,1808.99 v1(3118,1891.99) 3135.81,1891.99 3209.57,1965.75 3209.57,1993.03 3271.54,2055 3527.32,2055 3538.32,2066 4001.14,2066 4043.14,2024 4162.5,2024 4247,2108.5 4247,2258.57 4251,2262.57 4251,2270.08 4257,2276.08 4257,2551.43 4247,2561.43 4247,2646.62 4209,2684.62 4209,2726.67 4200,2735.67 v1(4200,2788) ; M1.R9@5815.49,2325.54 5829,2312.03 5829,2284.33 5825,2280.33 v1(5825,2251) ; R6.2@5821,1725 v1(5821,1776.88) ; M2.C6@5852.36,3323.42 5852.72,3323.06 5999.06,3323.06 v1(6013,3337) ; M3.E4@5858,3855.89 5858,3856.38 5872,3870.38 v1(5872,3872)
  L3_HS1 w6: v1(5872,3872) 5860.87,3872 5853.63,3864.76 5853.63,3858.19 5843.63,3848.19 5843.63,3812.9 5851,3805.53 5851,3774.86 5912,3713.86 5912,3682 5929,3665 5929,3637.86 5966.45,3600.41 5985.9,3600.41 5999.37,3586.94 5999.37,3585.28 6002.25,3582.4 6002.25,3572.52 6019,3555.76 6019,3545.68 6020.74,3543.94 6020.74,3524.88 6020,3524.14 6020,3385.86 6013,3378.86 v1(6013,3337)
  L5_SIG w6: v1(4912,3435) 4901.49,3424.49 4901.49,3367.51 5363,2906 5695.49,2906 5699,2909.51 5699,2964.86 5598.86,3065 5596.33,3065 5550,3111.33 5550,3138.67 5557.76,3146.43 5557.76,3154.9 5563.11,3160.25 5587.12,3160.25 5588.37,3159 5612.38,3159 5646,3192.62 5646,3373.67 5619,3400.67 5619,3802.49 5639.51,3823 5685.43,3823 5758.43,3896 5826.5,3896 5868.49,3896 5872,3892.49 v1(5872,3872) ; v1(5821,1776.88) 5809,1764.88 5671.75,1764.88 5665.12,1771.51 5665.12,2112.5 5777.23,2224.62 5798.62,2224.62 v1(5825,2251)
  L8_BOTTOM w6: v1(4200,2788) 4263.62,2788 4573.39,3097.77 4578.36,3097.77 4586.13,3090 4601.87,3090 4613,3101.13 4613,3136 v1(4912,3435) ; v1(5825,2251) 5825,2278 5935,2388 5954.15,2388 6037,2470.85 6037,2491.29 6040,2494.29 6040,2849.38 6037,2852.38 6037,3310.38 6023.52,3323.87 6023.52,3326.31 6013,3336.83 v1(6013,3337)
D3: M1.N8 M2.D5 M3.H4 R9.2 | length 3196.6
  L1_TOP w2: M2.D5@5822.47,3293.53 5834.94,3306 5925.63,3306 5929.12,3302.51 v1(6022.51,3302.51)
  L1_TOP w6: R9.2@5606,1731 v1(5606,1782.88) ; v1(5775,2370) 5776.15,2371.15 5776.15,2379.92 5783.99,2387.76 M1.N8@5783.99,2388.54 ; M3.H4@5858.13,3736.28 5859,3735.41 5859,3551 5865,3545 v1(5907,3545)
  L5_SIG w6: v1(5606,1782.88) 5606,1783.4 5551,1838.4 5551,1952.19 5608,2009.19 5608,2360.49 5628.51,2381 5681.38,2381 5698.38,2364 5748.67,2364 5754.67,2370 v1(5775,2370) 5800.85,2344.15 6037.15,2344.15 6141.15,2448.15 6141.15,3030.46 5982,3189.62 5982,3249.62 5984,3251.62 5984,3262.38 5967.37,3279.01 5941.6,3279.01 5872,3348.62 5872,3368.91 5873,3369.91 5873,3449.67 ; v1(5907,3545) 5870.31,3508.31 5870.31,3455.31 5874.47,3451.14 5919.12,3406.5 ; 5918.81,3406.2 5958.01,3367 v1(6022.51,3302.51)
D4: CN2.11 M1.P9 M2.E5 M3.H5 R51.2 | length 8091.9
  L1_TOP w6: v1(3174,3776) 3174,3699.5 3175,3698.5 ; M2.E5@5822.47,3264 5837.47,3279 v1(5880,3279) ; v1@5897.5,3577.54 M3.H5@5897.5,3736.28 ; v1(5897.94,2456.39) 5815.49,2373.94 M1.P9@5815.49,2357.04 5831.53,2341 6082.49,2341 6086,2337.49 6086,2186.55 6088,2184.55 6088,1882 R51.2@6028,1822
  L3_HS1 w6: v1(3122,4087) 3131,4078 3346.33,4078 3484.33,4216 4175.53,4216 4273.53,4314 4825.81,4314 4828.81,4317 5961.53,4317 5964.53,4314 5984.86,4314 6012.95,4285.91 6020.91,4285.91 6106,4200.81 6106,3247.33 6014.67,3156 6001.86,3156 5996,3150.14 5996,3137.33 5996,3082.45 5948.55,3035 5940.86,3035 5924.37,3018.52 5923.85,3018.52 5904.52,2999.19 5904.52,2990.97 5897.94,2984.39 v1(5897.94,2456.39)
  L5_SIG w6: v1(5897.63,3577.41) 5883.22,3563 5850.47,3563 5827.26,3539.79 5827.26,3509.88 5860.31,3476.83 5860.31,3451.17 5863,3448.47 5863,3374.05 5862,3373.05 5862,3297 v1(5880,3279) 5880,3277.79 5890,3267.79 5890,3158.49 5843,3111.49 5843,3001.55 5878,2966.55 5878,2881.53 5888,2871.53 5888,2839.86 5871.14,2823 5779.09,2823 5768.72,2833.36 5768.72,2838.64 5758.36,2849 5747.59,2849 5739.98,2841.38 5739.98,2830.62 5742.98,2827.62 5742.98,2793.88 5775,2761.86 5775,2579.33 v1(5897.94,2456.39)
  L6_HS2 w6: v1(3122,4087) 3095.62,4060.62 3087.23,4060.62 3062,4035.38 3062,3975 3174,3863 v1(3174,3776)
D5: CN2.14 M1.M14 M2.F5 M3.E5 R53.2 | length 6453.4
  L1_TOP w6: 3225,3901.5 v1(3225,4012) ; R53.2@5620,1874 5620,1915 v1(5637,1932) ; M2.F5@5822.47,3234.47 5838.94,3218 v1(5995,3218) 5996.15,3219.15 5997.98,3219.15 6227.78,3448.94 6227.78,3476.62 6231.88,3480.72 6259.55,3480.72 6266,3487.16 6266,3629.14 6219.49,3675.66 6065.99,3829.15 5942.31,3829.15 5916.74,3854.72 v1(5916.74,3875.26) M3.E5@5897.37,3855.89 ; M1.M14@5972.97,2420.03 5988,2435.06 v1(5988,2466)
  L3_HS1 w6: v1(3225,4012) 3330.02,4012 3340.02,4002 3609.98,4002 3619.98,4012 3698.18,4012 3701.18,4015 3949.38,4015 3949.47,4014.91 4194.28,4014.91 4196.51,4014.91 4199.42,4017.82 4205.15,4027.34 cw(c4239,4007) 4274.89,4023.49 4275.62,4022.76 4277.38,4021 4400.86,4021 4452.86,4073 4619.38,4073 4629.38,4063 4690.38,4063 4692.38,4065 4714,4065 4939.5,4290.5 5935.78,4290.5 5949.28,4277 5979.43,4277 6000.53,4255.91 6008.48,4255.91 6069,4195.38 6069,3891.77 6065.49,3888.26 5929.74,3888.26 v1(5916.74,3875.26)
  L8_BOTTOM w6: v1(5637,1932) 5719,1932 5802,2015 5802,2283.28 5981.75,2463.04 5983.41,2463.04 5986.38,2466 v1(5988,2466) 6017,2495 6017,2499.57 6020,2502.57 6020,2841.1 6017,2844.1 6017,3214.49 6013.49,3218 v1(5995,3218)
D5V: D20.2 J6.07 M29.49 M30.49 | length 16742.7
  L1_TOP w6: M29.49@2358.5,3205 v1(2481,3205) ; v1(4726,361) 4769.87,361 D20.2@4770.87,360 ; M30.49@4770.99,3231 v1(4853.85,3231)
  L4_POWER w6: v1(2481,3205) 2503,3227 2503,3282.14 2618.86,3398 2630.72,3398 2637.72,3405 2660.28,3405 2667.28,3398 2783.63,3398 2796.63,3385 2845.38,3385 2853,3377.38 2853,3323.55 2676,3146.55 2676,3084.72 2683.72,3077 2737.14,3077 2751,3063.14 2751,3045.02 2759,3037.02 2759,2996 2885.14,2869.86 2911.67,2869.86 2919.28,2877.47 2919.28,2899.99 2779,3040.27 2779,3045.3 2771,3053.3 2771,3080.73 2913,3222.73 2913,3348.73 2914,3349.73 2914,3352.46 2922,3360.46 2922,3368.84 2940.16,3387 3016.81,3387 3047,3417.19 3047,3425.84 3048,3426.84 3048,3453 2979,3522 2979,3561.49 2982.51,3565 3123.31,3565 3179,3509.31 3185.54,3502.77 3185.54,3464.62 3179,3458.08 3177.92,3457 3138.61,3457 3122.93,3472.68 3122.93,3537.09 3115.02,3545 3106.44,3545 3102.93,3541.49 3102.93,3464.39 3137.46,3429.87 3164.66,3429.87 3181,3413.53 3181,3394.47 3179,3392.47 3179,3161.5 3196.02,3144.49 3196.02,3113.01 3181,3097.99 3181,3078.76 3217.63,3042.13 3222.6,3042.13 3332.99,3152.52 3332.99,3177.92 3323,3187.91 3323,3212.53 3334.72,3224.25 cw(c3338.96,3220) 3334.85,3224.37 3337.19,3226.58 ccw(c3333.07,3230.94) 3339.06,3230.52 3339.58,3237.86 3339.58,3283.1 3314.48,3325.67 3313,3328.51 3300,3359.64 3300,3377.21 3313.47,3390.68 3332.53,3390.68 3346,3377.21 3346,3374.3 3353,3361.72 3353,3343.72 3396.15,3300.57 cw(c3389,3242) 3414.22,3295.34 3449.81,3295.34 3478.1,3323.62 3478.1,3350.49 3481.61,3354 3604.63,3354 3630,3328.63 3630,3223.19 3670,3183.19 3670,3119.67 3675.44,3114.23 3680.41,3114.23 3710,3143.81 3710,3222.38 3693,3239.38 3693,3306.67 3672,3327.67 3672,3334.49 3728.3,3390.78 3733.27,3390.78 3919.05,3205 4002.86,3205 4083.86,3124 4171.81,3124 4180.81,3115 4222.28,3115 4276.22,3061.07 4276.22,2950.17 4138,2811.96 4138,2718.86 4164.93,2691.93 4173.21,2691.93 4202,2720.72 4202,2748 4195,2755 4188.14,2755 4184.63,2758.51 4184.63,2763.49 4196.14,2775 4205.38,2775 4359,2928.62 4359,3132.67 4256.33,3235.33 4202.67,3235.33 4129,3309 4087.51,3309 4084,3312.51 4084,3318.86 4224.39,3459.25 4229.36,3459.25 4457.62,3231 v1(4853.85,3231) ; J6.07@4292,2403 4295,2400 4590.49,2400 4721,2269.49 4721,2167.72 4665.28,2112 4640.47,2112 4627,2098.53 4627,1693.19 4594,1660.19 4594,1110.19 4559.31,1075.5 4559.31,983.55 4571.03,971.84 4587.6,971.84 4748,1132.24 4748,2017.53 4771,2040.53 4771,2464.5 5521,3214.5 5521,3277.62 ; v1(4726,361) 4726,362.21 5534,1170.21 5534,1906.62 5541,1913.62 5541,2531.47 5534,2538.47 5534,3045.38 5537.76,3049.14 5537.76,3260.86 5521,3277.62 ; v1(4906,3228) 5232,3554 5529,3554 5534,3549 5534,3301.38 5521,3288.38 5521,3277.62
  L5_SIG w6: v1(4853.85,3231) 4870.99,3213.86 4878.86,3213.86 4881.86,3210.86 4888.86,3210.86 v1(4906,3228)
D6: CN2.12 M1.M13 M2.F6 M3.H6 R55.2 | length 10755.5
  L1_TOP w6: v1(3159,3986) 3175,3970 3175,3901.5 ; v1(5687,1885) 5721,1885 R55.2@5730,1876 ; M2.F6@5852.36,3234.83 5852.72,3234.47 5948.47,3234.47 v1(5971,3257) ; v1@5936.87,3577.54 M3.H6@5936.87,3736.28 ; M1.M13@5941.47,2420.03 5942.02,2419.48 5942.02,2409.37 5948.77,2402.62 v1(5948.77,2401)
  L5_SIG w6: v1(2780,3885) 3075.5,3885 3159,3968.5 v1(3159,3986)
  L6_HS2 w6: v1(2780,3885) 2780,4019 3271,4510 3280.38,4510 3387,4616.62 3387,4849.62 3427,4889.62 3427,5270.85 3466.37,5310.22 3678.08,5310.22 3752.29,5236 3964,5236 4019.5,5291.5 4581.84,5291.5 4637.34,5236 5011.75,5236 5042.75,5267 5868,5267 6491,4644 6491,3311 6658,3144 6658,2643 6502,2487 6034.77,2487 v1(5948.77,2401) ; v1(5937,3577.41) 5937,3388.62 5971,3354.62 v1(5971,3257)
  L8_BOTTOM w6: v1(5687,1885) 5812,2010 5812,2279.14 5933.77,2400.91 5948.68,2400.91 6027,2479.23 6027,2495.43 6030,2498.43 6030,2845.24 6027,2848.24 6027,3250.57 6023.49,3254.09 5975.54,3254.09 5972.62,3257 v1(5971,3257)
D7: CN2.13 M1.L8 M2.G6 M3.E6 R58.2 | length 6565.9
  L1_TOP w6: 3225,3698.5 3225,3759 3218,3766 3196.62,3766 3189,3773.62 3189,3784.38 3196.62,3792 3230.45,3792 3233.45,3789 3335,3789 v1(3348,3776) ; M1.L8@5783.74,2451.28 v1(5783.74,2427.29) 5762.5,2406.05 5762.5,2384.39 5756.64,2378.54 5713.55,2378.54 5710.04,2375.02 5710.04,2351.51 5701,2342.47 5701,1998 5689.69,1986.69 5595.31,1986.69 5584,1975.38 5584,1964.62 5593.62,1955 5740.06,1955 5816.06,1879 R58.2@5820,1879 ; M2.G6@5852.36,3205.31 5852.72,3204.94 5985.06,3204.94 v1(6001,3189) ; M3.E6@5936.74,3855.89 v1(5956.11,3875.26)
  L5_SIG w6: v1(3348,3776) 3348,3804.67 3442.33,3899 3605.99,3899 3617.99,3911 3757.28,3911 3770.28,3898 4050,3898 4068,3880 4447.38,3880 4450.38,3877 4541.53,3877 4550.53,3868 4676.47,3868 4685.47,3877 4810.19,3877 4824.19,3863 5373,3863 v1(5453,3943) ; v1(5956.11,3875.26) 5982.88,3875.26 5991.62,3884 6137.97,3884 6144,3877.97 6144,3192.51 6140.49,3189 v1(6001,3189)
  L6_HS2 w6: v1(5453,3943) 5460,3936 5484.49,3936 5488,3939.51 5488,3952.14 5551.86,4016 5614.53,4016 5618.53,4012 5707,4012 5732,3987 5862.75,3987 5890.37,3959.38 5890.37,3948.62 5882.75,3941 5869.38,3941 5843.38,3967 5830,3967 5822,3959 5822,3936.38 5841,3917.38 5841,3916.36 5867.1,3890.26 5886.16,3890.26 5913,3917.1 5913,3921.38 5943.11,3951.49 5943.11,3959.38 5944,3960.27 5944,3977.64 5982.15,3977.64 5983,3978.49 5983,3902.15 v1(5956.11,3875.26)
  L8_BOTTOM w6: v1(5783.74,2427.29) 5831.22,2474.77 5978.39,2474.77 5982.62,2479 ; 5982.63,2479 6007,2503.37 6007,2503.72 6010,2506.72 6010,2836.95 6007,2839.95 6007,3182.49 6001,3188.49 v1(6001,3189)
D8: CN2.16 M1.L2 M2.B1 M3.F3 R60.2 | length 5818.4
  L1_TOP w6: 3275,3901.5 v1(3275,3984.5) 3299.13,3960.37 3299.13,3825.35 3300,3824.48 3312.1,3824.48 3322.1,3814.48 3343,3814.48 3364.48,3793 v1(3394,3793) ; M1.L2@5595.02,2451.53 5610.49,2467 5635,2467 5644,2476 5644,2490 5635,2499 v1(5618,2499) ; v1(5613,3360) 5614.62,3360 5622.04,3352.58 5703.64,3352.58 M2.B1@5704,3352.22 ; M3.F3@5817.26,3815.15 5817.26,3812.73 5826.85,3803.14 5826.85,3797.15 v1(5828,3796) ; R60.2@5917,1731 v1(5917,1782.88)
  L3_HS1 w6: v1(5547,3040) 5597,3040 5608.5,3028.5 5608.5,2769.32 5618,2759.81 v1(5618,2499)
  L5_SIG w6: v1(3394,3793) 3394,3803.7 3433.22,3842.93 3459.3,3869 3618.42,3869 3630.42,3881 3744.86,3881 3757.86,3868 3879.93,3868 3897.93,3850 4434.95,3850 4467.95,3817 4681.38,3817 4799.92,3698.46 5274.54,3698.46 v1(5613,3360) 5613,3339.38 5540,3266.38 5540,3175.14 5537.76,3172.9 5537.76,3160.08 5530,3152.32 5530,3057 v1(5547,3040) ; v1(5618,2499) 5598,2479 5598,2013.33 5541,1956.33 5541,1826.38 5612.5,1754.88 5817.38,1754.88 5836.5,1774 5908.12,1774 v1(5917,1782.88)
  L6_HS2 w6: v1(5613,3360) 5612.19,3360.81 5612.19,3453.28 5615.71,3456.79 5711.32,3456.79 5727,3472.47 5727,3769 5754,3796 v1(5828,3796)
D9: CN2.15 M1.M3 M2.C1 M3.G3 R62.2 | length 5521.2
  L1_TOP w4: M3.G3@5818.63,3775.78 5840.26,3754.15 v1(5840.26,3534.41)
  L1_TOP w6: R62.2@3209,3598.56 3212.94,3598.56 3223.5,3588 v1(3267,3588) ; R62.2@3210.44,3600 3271.49,3600 3278,3606.52 CN2.15@3278,3698.5 ; M1.M3@5626.51,2420.03 5616.51,2410.03 5616.51,2384.39 5639.58,2361.33 5639.58,2211.81 5640,2211.38 5640,2200.62 5632.38,2193 5612.49,2193 5606.49,2187 5431.47,2187 5301,2317.47 5301,2380.47 5272.37,2409.1 5272.37,2414.07 5282.12,2423.81 5282.12,2800.41 5272,2810.53 5272,3129.86 5308,3165.86 5308,3259.38 5351.41,3302.8 5447.1,3302.8 5494.31,3350 v1(5516,3350) 5542.94,3323.06 5703.64,3323.06 M2.C1@5704,3322.69
  L3_HS1 w6: v1(3267,3588) 3283,3572 3560.38,3572 3750.38,3762 3825.53,3762 3910.53,3677 3993.96,3677 4165.96,3505 4717,3505 4773,3449 5432,3449 5516,3365 v1(5516,3350)
  L8_BOTTOM w6: v1(5516,3350) 5533.58,3332.42 5738.49,3332.42 5742,3335.94 5742,3444.38 5786.44,3488.82 5794.67,3488.82 v1(5840.26,3534.41)
D10: CN2.19 M1.M2 M2.C2 M3.F4 R66.2 | length 10827.8
  L1_TOP w6: v1(3305,3603) 3306.15,3601.85 3306.15,3588.02 3321.38,3572.78 3362.62,3572.78 3368.48,3578.64 3368.48,3621.36 3375,3627.87 3375,3698.5 ; R66.2@3846,2173.56 3854.56,2165 v1(3896,2165) ; v1(5417,2454) 5437,2434 5581.05,2434 M1.M2@5595.02,2420.03 ; v1(5455,3365) 5532,3365 5562,3335 5638,3335 5643,3340 5716.94,3340 M2.C2@5733.89,3323.06 ; v1(5827,3835) 5828.15,3833.85 5839.3,3833.85 5856.63,3816.52 M3.F4@5856.63,3815.15
  L3_HS1 w6: v1(2740,3364) 2740,3347.42 2775.42,3312 2826.67,3312 2911.14,3396.47 2911.14,3570.03 2969.62,3628.5 2993.62,3628.5 3041.12,3581 3161.25,3581 3183.25,3603 v1(3305,3603)
  L4_POWER w6: v1(2740,3364) 2724,3364 2636,3276 2636,2832.38 2645,2823.38 2645,2759.52 2630.16,2744.68 2630.16,2680.82 2633,2677.98 2633,2540.86 2666,2507.86 2666,2336.92 2742.48,2260.44 2843.91,2260.44 2890.94,2307.47 2925.82,2307.47 2930.36,2312 2950.1,2312 2954.1,2316 2977.53,2316 2991,2302.53 2991,2283.47 2978.91,2271.38 2978.91,2269.19 2968.91,2259.19 2967.62,2259.19 2960.14,2251.71 2946.04,2251.71 2943.33,2249 2929.19,2249 2895.19,2215 2872.47,2215 2851,2193.53 2851,2170 2867,2154 2867,1916.72 2959.72,1824 3052.99,1824 3060.11,1816.88 3395.84,1816.88 3410.72,1802 3671.28,1802 3686.16,1816.88 3903.07,1816.88 3905.19,1819 3928,1819 3943,1834 3943,1879.76 3826.76,1996 3818.86,1996 3805,2009.86 3805,2017.53 3791.53,2031 3779.62,2031 3771,2039.62 3771,2063 3828.93,2120.93 3851.93,2120.93 v1(3896,2165)
  L6_HS2 w6: v1(3896,2165) 3896,2166.04 3885.91,2176.13 3885.91,2182.91 3965,2262 5423.49,2262 5427,2265.51 5427,2442.79 5417,2452.79 v1(5417,2454)
  L8_BOTTOM w6: v1(5417,2454) 5417,2511.62 5468,2562.62 5468,2956.5 5455,2969.5 ; v1(5455,3365) 5455,2969.5 ; v1(5827,3835) 5809.37,3852.63 5602.65,3852.63 5602.25,3852.23 5599.04,3852.23 5595.53,3848.72 5595.53,3815.14 5603,3807.67 5603,3780.33 5599,3776.33 5599,3769.72 5595.53,3766.24 5595.53,3697 5366,3467.47 5366,3205.33 5379,3192.33 5379,2930.18 5331,2882.18 5331,2789.86 5292.12,2750.98 5292.12,2621.26 5290,2619.14 5290,2416.67 5284,2410.67 5284,2383.33 5290,2377.33 5290,2342.62 5367.62,2265 5387.38,2265 5395,2272.61 5395,2337.39 5339.38,2393 5331.39,2393 5322.38,2384 5311.62,2384 5304,2391.62 5304,2402.38 5318,2416.38 5318,2557.62 5317,2558.62 5317,2569.38 5318,2570.38 5318,2704.38 5455,2841.38 5455,2969.5
D11: CN2.20 M1.P1 M3.G4 R69.2 | length 9181.4
  L1_TOP w4: 5910.97,3558 5919,3549.97 5919,3374 v1(5934,3359)
  L1_TOP w6: R69.2@2094,4500 2094,4496.06 2104.78,4485.28 2154.78,4485.28 2179.09,4460.96 2215.87,4460.96 2225.9,4471 2310.1,4471 2385.66,4395.44 2385.66,4364.95 2674,4076.62 2674,3966.71 2676,3964.71 2676,3538.8 2683.8,3531 2825.2,3531 2833,3538.8 2833,3992.95 2906.38,4066.34 3322.66,4066.34 3375,4014 3375,3901.5 ; v1(5342,2416) 5400.96,2357.04 M1.P1@5563.52,2357.04 ; M3.G4@5858,3775.78 5879.67,3754.11 5879.67,3576.99 5898.65,3558 5910.97,3558 5932.59,3558 5969.19,3521.41 6052.8,3521.41 6172.39,3641 v1(6206.07,3641)
  L5_SIG w6: v1(3374,4015) 3418,4059 3637.67,4059 3640.67,4056 3832.37,4056 3833.06,4055.3 4167.7,4055.3 4168.9,4056.5 4408.89,4056.5 4418.38,4047 4486.38,4047 4527.97,4088.59 4549,4088.59 4620.01,4159.6 4728.21,4159.6 4794.81,4093 4885,4093 4961,4169 5292.33,4169 5300.33,4177 5349,4177 5658,4486 6082,4486 6222,4346 6222,4314.67 6233,4303.67 6233,4278.33 6222,4267.33 6222,4073.76 6221,4072.76 6221,3655.93 v1(6206.07,3641)
  L8_BOTTOM w6: v1(5342,2416) 5607,2416 5680,2489 5707.36,2489 5714.59,2481.77 5824.08,2481.77 5827.08,2484.77 5971.83,2484.77 5976.05,2489 5978.49,2489 5996,2506.51 5996,2506.86 6000,2510.86 6000,2832.81 5996,2836.81 5996,3175.62 5926,3245.62 5926,3297.5 5934,3305.5 v1(5934,3359)
D12: CN2.17 M1.N2 M2.E2 M3.F5 R71.2 | length 10282.2
  L1_TOP w6: R71.2@672,4151 v1(726,4151) ; v1(3202,3779) 3310.52,3779 3339,3750.52 CN2.17@3339,3680.01 ; v1(5374,2448) 5429,2393 5551,2393 5558,2400 5583.55,2400 M1.N2@5595.02,2388.54 ; v1(5560,3268) 5561.21,3268 5571.21,3278 5719.89,3278 M2.E2@5733.89,3264 ; v1(5876.63,3834.52) M3.F5@5896,3815.15
  L3_HS1 w6: v1(5560,3268) 5599.72,3228.28 5607.43,3228.28 5646,3189.72 5646,3075.51 5649.51,3072 5869.16,3072 5871.16,3070 5919.29,3070 5924.29,3075 5931.98,3075 5956,3099.02 5956,3197.38 6000.62,3242 6040,3242 6066,3268 6066,3812.49 6062.49,3816 5901.68,3816 5884.3,3833.37 5877.78,3833.37 v1(5876.63,3834.52)
  L5_SIG w6: v1(3202,3779) 3202,3879 3279,3956 ; 3279.03,3956 3291.03,3968 3412.34,3968 3413.34,3969 3577,3969 3603,3995 3603,4023.38 3618.62,4039 3629.38,4039 3648.38,4020 4170.14,4020 4222.64,3967.5 4255.36,3967.5 4278.5,3990.64 4278.5,3990.88 4301.62,4014 4484,4014 4524.5,4054.5 4557.24,4054.5 4573.74,4071 4621.38,4071 4635.38,4057 4671.47,4057 4686.47,4042 4730.38,4042 4738,4049.62 4738,4061 4742,4065 4851.62,4065 4861.62,4055 5027.62,4055 5099.62,4127 5278.62,4127 5308.62,4157 5357.28,4157 5382.28,4182 5393.35,4182 5405.35,4194 5630,4194 5855,4419 6089.38,4419 6213,4295.38 6213,4286.62 6201,4274.62 6201,4232.62 5913,3944.62 5913,3894.62 5876.63,3858.25 v1(5876.63,3834.52)
  L8_BOTTOM w6: v1(726,4151) 1674.38,4151 1810.38,4287 2611.69,4287 2957.19,3941.5 3186.38,3941.5 3299,3828.88 3299,3798.62 3273.53,3773.15 3241.5,3773.15 3235.65,3779 v1(3202,3779) ; v1(5374,2448) 5375.62,2448 5384.62,2439 5438.38,2439 5519,2519.62 5519,2809.38 5560,2850.38 5560,3149.42 5559,3150.42 5559,3267 v1(5560,3268)
D13: CN2.35 M1.R1 M2.F2 M3.G6 R21.2 | length 4831.5
  L1_TOP w4: M3.G6@5936.74,3775.78 5958.37,3754.15 5958.37,3577.37 v1(5957,3576)
  L1_TOP w6: v1(3775,3781.5) 3775,3779.88 3778,3776.88 CN2.35@3778,3698.5 ; R21.2@4269,3536.56 4272.94,3536.56 4283.72,3525.78 4330.6,3525.78 4333.38,3523 v1(4335,3523) ; v1(5360,2291) 5394.54,2325.54 M1.R1@5563.52,2325.54 ; v1(5442,3244) 5497.22,3244 5500.22,3241 5553.81,3241 5557.81,3245 5639.99,3245 5644.99,3250 5718.36,3250 M2.F2@5733.89,3234.47
  L3_HS1 w6: v1(3775,3781.5) 3818.14,3781.5 3823.09,3776.56 3828.06,3776.56 3831.57,3780.07 3831.57,3794.93 3850.57,3813.93 3877.43,3813.93 4168.36,3523 v1(4335,3523) 4765,3523 v1(4784,3542)
  L5_SIG w6: v1(4784,3542) 5144,3542 v1(5442,3244)
  L8_BOTTOM w6: v1(5360,2291) 5308,2343 5308,2373.47 5294,2387.47 5294,2406.53 5300,2412.53 5300,2414.53 5308,2422.53 5308,2553.47 5307,2554.47 5307,2573.53 5308,2574.53 5308,2752.72 5341,2785.72 5341,2878.04 5389,2926.04 5389,3191 v1(5442,3244) 5376,3310 5376,3463.33 5573.67,3661 5579.47,3661 5582.47,3664 5601.53,3664 5604.53,3661 5758.78,3661 5847.76,3572.02 5849.5,3572.02 5850.47,3573 5869.53,3573 5870.5,3572.02 5884.63,3572.02 5892.25,3564.41 5942.38,3564.41 5950.98,3573 5952.38,3573 5955.38,3576 v1(5957,3576)